# Altium PCB EMG-Arm-ELEC-V2.0.PcbDoc (part 3 of 5)
Units mil, origin at the board's own origin, x right, y up, seen from the top; angles counter-clockwise.
Board outline 8303.83 x 7532.25 mil, 2 copper layers (Top Layer, Bottom Layer), stack 3.556 mil thick; 263 components, 174 nets, 696 pads, 313 vias.
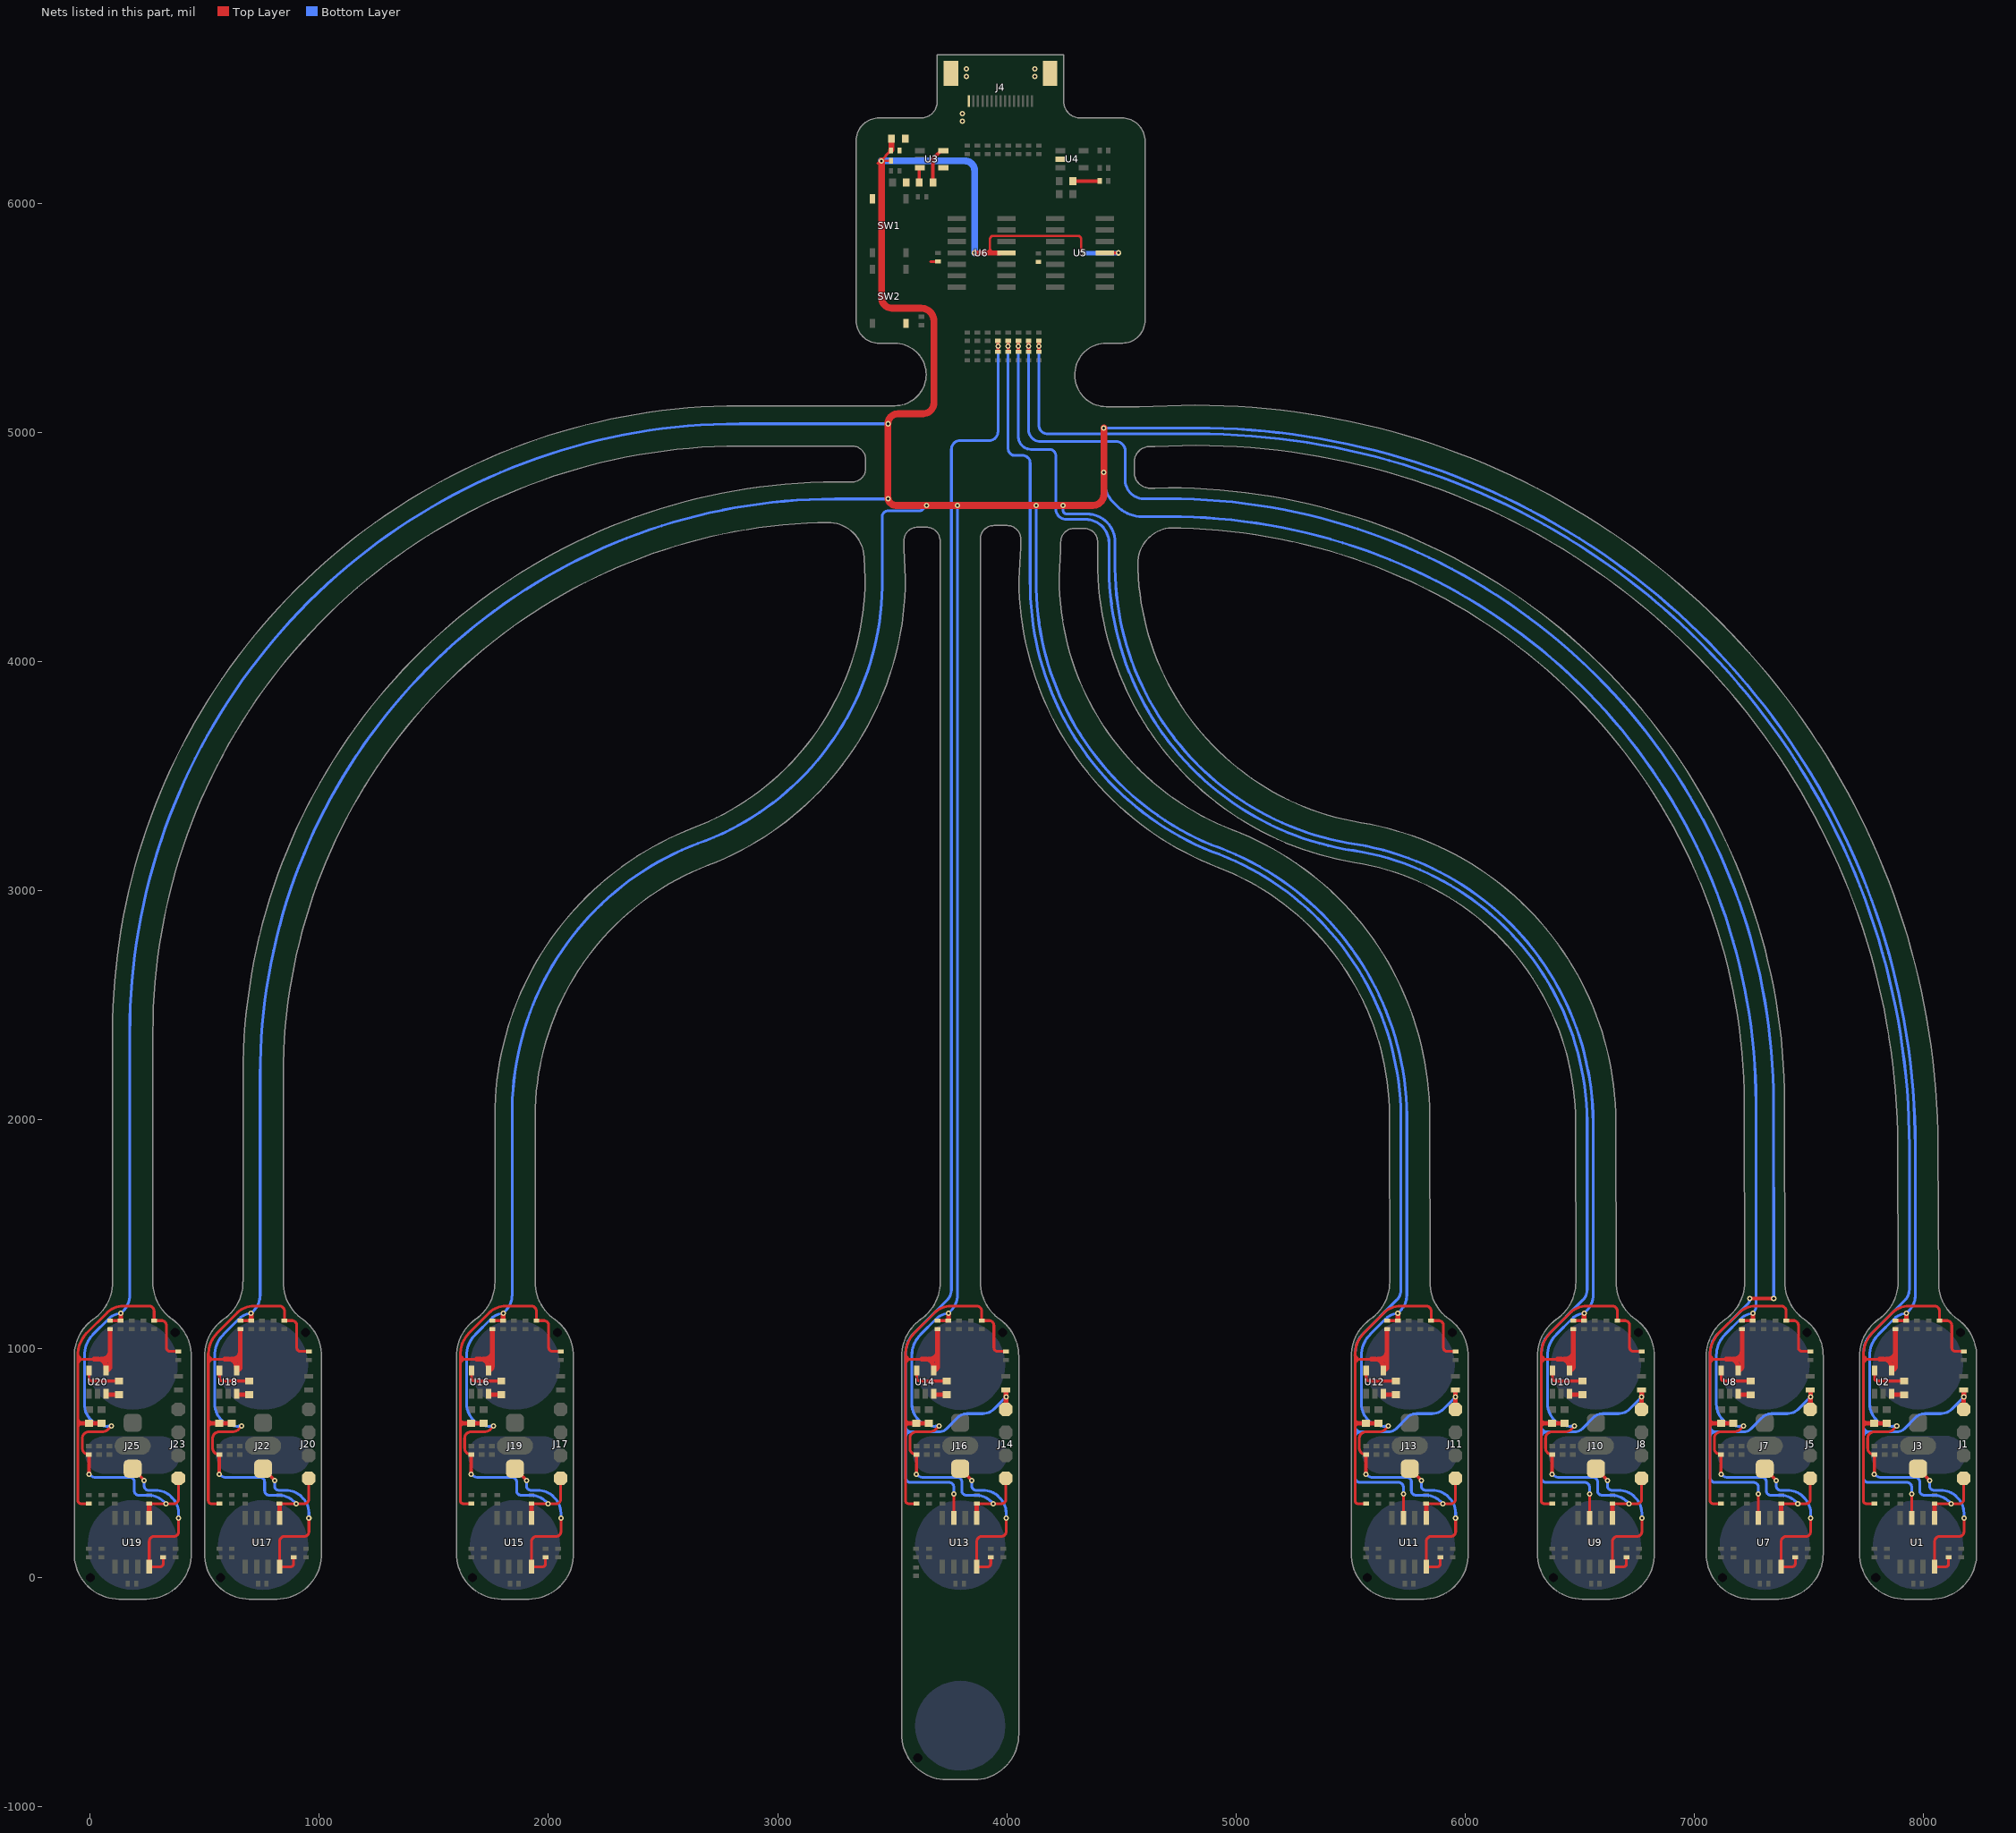
[diagram p2: the nets of this part, all layers, seen from the top]

## Via types
v1: diameter 23.62, hole 11.81, Top Layer to Bottom Layer, tented both sides, 313 vias

## Nets (pads, with @x,y where several pads share a name; then routed paths per layer and width w, separated by ;. In a path a pad name is that pad's centre, name@x,y a point inside that pad or via, vN(x,y) a via of type N, cw(c..) or ccw(c..) an arc to the next point about the centre after c; other vN are vias at no path point) (continued)
-VCC_3V3: C2.1 C7.1 C12.1 C17.1 C22.1 C27.1 C32.1 C37.1 C42.1 J1.4 J5.4 J8.4 J11.4 J14.4 J17.4 J20.4 J23.4 SB11.2 SB29.1 SB104.2 SB110.2 SB112.1 SB204.2 SB210.2 SB212.1 SB304.2 SB310.2 SB312.1 SB404.2 SB410.2 SB412.1 SB504.2 SB510.2 SB512.1 SB604.2 SB610.2 SB612.1 SB704.2 SB710.2 SB712.1 SB804.2 SB810.2 SB812.1 U1.5 U5.11 U6.11 U7.5 U9.5 U11.5 U13.5 U15.5 U17.5 U19.5 | length 58644.1
  Top Layer w10: v1(3453.38,6185.05) 3453.82,6185.49 3494.45,6185.49 SB11.2@3494.89,6185.93 ; 3904.77,5783.05 ccw(c3904.77,5805.41) 3927.13,5805.41 ; 3927.13,5791.41 3927.13,5805.41 ; 3949.49,5783.05 cw(c3949.49,5805.41) 3927.13,5805.41 ; v1(4325.38,5782.28) 4325.38,5843.25 ccw(c4310.81,5843.25) 4310.81,5857.82 3941.48,5857.82 ccw(c3941.48,5843.48) 3927.13,5843.48 3927.13,5805.41
  Top Layer w12: SB810.2@-5.97,536.5 -6.99,536.5 cw(c-6.99,564.5) -34.99,564.5 -34.99,607.98 cw(c-7.32,607.98) -7.32,635.65 49.78,635.65 ccw(c49.78,677.75) 79.56,647.98 91.89,660.31 v1(91.89,660.6) ; C42.1@257.04,322.05 257.2,322.21 329.59,322.21 v1(329.75,322.37) 330.07,322.05 365.7,322.05 ccw(c365.7,340.55) 384.2,340.55 J23.4@384.2,433.06 ; SB710.2@563.01,536.5 561.98,536.5 cw(c561.98,564.5) 533.98,564.5 533.98,607.98 cw(c561.65,607.98) 561.65,635.65 618.76,635.65 ccw(c618.76,677.75) 648.53,647.98 660.87,660.31 v1(660.87,660.6) ; C37.1@826.01,322.05 826.17,322.21 898.57,322.21 v1(898.73,322.37) 899.04,322.05 934.67,322.05 ccw(c934.67,340.55) 953.17,340.55 J20.4@953.17,433.06 ; SB610.2@1662.8,536.5 1661.77,536.5 cw(c1661.77,564.5) 1633.77,564.5 1633.77,607.98 cw(c1661.44,607.98) 1661.44,635.65 1718.54,635.65 ccw(c1718.54,677.75) 1748.32,647.98 1760.65,660.31 v1(1760.65,660.6) ; C32.1@1925.8,322.05 1925.96,322.21 1998.35,322.21 v1(1998.51,322.37) 1998.83,322.05 2034.45,322.05 ccw(c2034.45,340.55) 2052.95,340.55 J17.4@2052.95,433.06 ; 3437.32,6173.92 3449.02,6185.62 3452.81,6185.62 3472.9,6205.7 3472.9,6208.71 SB29.1@3494.45,6230.26 ; v1(3453.38,6185.05) v1@3454.38,6184.05 ; SB11.2@3494.89,6185.93 SB11.2@3495.14,6186.18 ; SB510.2@3606.28,536.5 3605.25,536.5 cw(c3605.25,564.5) 3577.25,564.5 3577.25,607.98 cw(c3604.92,607.98) 3604.92,635.65 3662.03,635.65 ccw(c3662.03,677.75) 3691.8,647.98 3704.13,660.31 v1(3704.13,660.6) ; C27.1@3869.28,322.05 3869.44,322.21 3941.83,322.21 v1(3941.99,322.37) 3942.31,322.05 3977.94,322.05 ccw(c3977.94,340.55) 3996.44,340.55 J14.4@3996.44,433.06 ; U6.11@3970.58,5783.05 U6.11@3999.4,5783.05 ; U5.11@4429.4,5783.05 v1(4488.82,5783.05) ; SB410.2@5568.45,536.5 5567.41,536.5 cw(c5567.41,564.5) 5539.41,564.5 5539.41,607.98 cw(c5567.08,607.98) 5567.08,635.65 5624.19,635.65 ccw(c5624.19,677.75) 5653.97,647.98 5666.3,660.31 v1(5666.3,660.6) ; C22.1@5831.45,322.05 5831.6,322.21 5904,322.21 v1(5904.16,322.37) 5904.47,322.05 5940.1,322.05 ccw(c5940.1,340.55) 5958.6,340.55 J11.4@5958.6,433.06 ; SB310.2@6381.16,536.49 6380.13,536.49 cw(c6380.13,564.49) 6352.13,564.49 6352.13,607.97 cw(c6379.8,607.97) 6379.8,635.64 6436.91,635.64 ccw(c6436.91,677.75) 6466.68,647.97 6479.01,660.31 v1(6479.01,660.6) ; C17.1@6644.16,322.04 6644.32,322.2 6716.71,322.2 v1(6716.87,322.36) 6717.19,322.04 6752.82,322.04 ccw(c6752.82,340.54) 6771.32,340.54 J8.4@6771.32,433.05 ; SB210.2@7117.9,536.5 7116.88,536.5 cw(c7116.88,564.5) 7088.88,564.5 7088.88,607.98 cw(c7116.55,607.98) 7116.55,635.65 7173.65,635.65 ccw(c7173.65,677.75) 7203.43,647.98 7215.76,660.31 v1(7215.76,660.6) ; C12.1@7380.91,322.05 7381.07,322.21 7453.46,322.21 v1(7453.62,322.37) 7453.94,322.05 7489.57,322.05 ccw(c7489.57,340.55) 7508.07,340.55 J5.4@7508.07,433.06 ; SB110.2@7787.38,536.5 7786.35,536.5 cw(c7786.35,564.5) 7758.35,564.5 7758.35,607.98 cw(c7786.02,607.98) 7786.02,635.65 7843.13,635.65 ccw(c7843.13,677.75) 7872.9,647.98 7885.24,660.31 v1(7885.24,660.6) ; C2.1@8050.38,322.05 8050.54,322.21 8122.94,322.21 v1(8123.09,322.37) 8123.41,322.05 8159.04,322.05 ccw(c8159.04,340.55) 8177.54,340.55 J1.4@8177.54,433.06
  Top Layer w15: v1(-5.96,449.88) SB810.2@-5.97,536.5 ; SB812.1@86.15,1121.42 SB804.2@133.24,1121.42 ; v1(563.01,449.88) SB710.2@563.01,536.5 ; SB712.1@655.12,1121.42 SB704.2@702.22,1121.42 ; v1(1662.8,449.88) SB610.2@1662.8,536.5 ; SB612.1@1754.91,1121.42 SB604.2@1802,1121.42 ; v1(3606.28,449.88) SB510.2@3606.28,536.5 ; SB512.1@3698.39,1121.42 SB504.2@3745.49,1121.42 ; v1(5568.45,449.88) SB410.2@5568.45,536.5 ; SB412.1@5660.56,1121.42 SB404.2@5707.65,1121.42 ; v1(6381.16,449.87) SB310.2@6381.16,536.49 ; SB312.1@6473.27,1121.41 SB304.2@6520.37,1121.41 ; v1(7117.91,449.88) SB210.2@7117.9,536.5 ; SB212.1@7210.02,1121.42 SB204.2@7257.11,1121.42 ; v1(7787.38,449.87) SB110.2@7787.38,536.5 ; SB112.1@7879.49,1121.42 SB104.2@7926.59,1121.42
  Top Layer w20: SB804.2@133.24,1124.42 v1(133.24,1153.05) ; U19.5@257.04,259.35 C42.1@257.04,320.05 ; SB704.2@702.22,1124.42 v1(702.22,1153.05) ; U17.5@826.01,259.35 C37.1@826.01,320.05 ; SB604.2@1802,1124.42 v1(1802,1153.05) ; U15.5@1925.8,259.35 C32.1@1925.8,320.05 ; SB504.2@3745.49,1124.42 v1(3745.49,1153.05) ; v1(3860.08,5783.05) 3904.77,5783.05 3949.49,5783.05 U6.11@3970.58,5783.05 ; U13.5@3869.28,259.35 C27.1@3869.28,320.05 ; SB404.2@5707.65,1124.42 v1(5707.65,1153.05) ; U11.5@5831.44,259.35 C22.1@5831.45,320.05 ; SB304.2@6520.37,1124.41 v1(6520.37,1153.04) ; U9.5@6644.16,259.34 C17.1@6644.16,320.04 ; SB204.2@7257.11,1124.42 v1(7257.11,1153.05) ; U7.5@7380.91,259.35 C12.1@7380.91,320.05 ; SB104.2@7926.59,1124.42 v1(7926.59,1153.05) ; U1.5@8050.38,259.35 C2.1@8050.38,320.05
  Top Layer w25: SB29.1@3495.39,6230.98 3497.38,6232.98 C7.1@3497.38,6282.05
  Top Layer w30: v1@3454.38,6184.05 3454.38,5586.54 ccw(c3498.96,5586.54) 3498.96,5541.96 3625.72,5541.96 cw(c3625.72,5485.29) 3682.38,5485.29 3682.38,5128.92 cw(c3634.52,5128.92) 3634.52,5081.05 3525.83,5081.05 ccw(c3525.83,5036.94) v1(3481.72,5036.94) 3481.72,4716.35 ccw(c3517.36,4716.35) 3517.36,4680.7 v1(3651.2,4680.7) v1(3785.04,4680.7) v1(4128.73,4680.7) v1(4245.61,4680.7) 4375.65,4680.7 ccw(c4375.65,4729.44) 4424.38,4729.44 v1(4424.38,4824.72) v1(4424.38,5018.94)
  Bottom Layer w12: v1(-5.96,449.88) ccw(c24.94,480.78) 24.94,437.08 172.85,437.08 cw(c172.85,417.89) 192.04,417.89 192.04,377.92 ccw(c210.9,377.92) 210.9,359.06 251.64,359.06 cw(c251.64,259.06) 275.82,356.09 cw(c251.64,259.06) 322.35,329.77 v1(329.75,322.37) ; 11.56,1060.23 ccw(c101.99,969.76) -25.93,969.76 -25.93,969.69 -25.93,756.99 ccw(c71.04,756.99) 78.12,660.28 91.89,660.46 v1(91.89,660.6) ; 11.56,1060.33 81.15,1129.91 cw(c137.24,1073.82) v1(133.24,1153.05) 143.05,1162.86 ccw(c72.34,1233.57) 172.34,1233.57 172.34,2378.94 cw(c2832.24,2377.04) 2834.14,5036.94 v1(3481.72,5036.94) ; v1(563.01,449.88) ccw(c593.91,480.78) 593.91,437.08 741.82,437.08 cw(c741.82,417.89) 761.01,417.89 761.01,377.92 ccw(c779.87,377.92) 779.87,359.06 820.61,359.06 cw(c820.61,259.06) 844.8,356.09 cw(c820.61,259.06) 891.32,329.77 v1(898.73,322.37) ; 580.54,1060.23 ccw(c670.97,969.76) 543.05,969.76 543.05,969.69 543.05,756.99 ccw(c640.02,756.99) 647.1,660.28 660.87,660.46 v1(660.87,660.6) ; 580.54,1060.33 650.12,1129.91 cw(c706.22,1073.82) v1(702.22,1153.05) 712.03,1162.86 ccw(c641.32,1233.57) 741.32,1233.57 741.32,2193.94 cw(c3252.73,2197.53) 3249.14,4708.94 3482.1,4708.94 v1(3482.43,4709.26) ; v1(1662.8,449.88) ccw(c1693.7,480.78) 1693.7,437.08 1841.61,437.08 cw(c1841.61,417.89) 1860.8,417.89 1860.8,377.92 ccw(c1879.66,377.92) 1879.66,359.06 1920.39,359.06 cw(c1920.39,259.06) 1944.58,356.09 cw(c1920.39,259.06) 1991.11,329.77 v1(1998.51,322.37) ; 1680.32,1060.23 ccw(c1770.75,969.76) 1642.83,969.76 1642.83,969.69 1642.83,756.99 ccw(c1739.8,756.99) 1746.88,660.28 1760.65,660.46 v1(1760.65,660.6) ; 1680.32,1060.33 1749.91,1129.91 cw(c1806,1073.82) v1(1802,1153.05) 1811.9,1162.95 ccw(c1741.19,1233.66) 1841.19,1233.66 ; 1841.32,1233.78 1841.32,2014.96 cw(c3096.2,2031.03) 2688.55,3217.96 ccw(c2245.92,4344.71) 3456.37,4361.53 3456.37,4630.88 cw(c3482.43,4630.88) 3482.43,4656.94 3618.23,4656.94 ccw(c3618.23,4679.16) 3633.92,4663.43 ; v1(3606.28,449.88) ccw(c3637.18,480.78) 3637.18,437.08 3785.09,437.08 cw(c3785.09,417.89) 3804.28,417.89 3804.28,377.92 ccw(c3823.14,377.92) 3823.14,359.06 3863.88,359.06 cw(c3863.88,259.06) 3888.06,356.09 cw(c3863.88,259.06) 3934.59,329.77 v1(3941.99,322.37) ; 3623.81,1060.23 ccw(c3714.24,969.76) 3586.32,969.76 3586.32,969.69 3586.32,756.99 ccw(c3683.29,756.99) 3690.36,660.28 3704.14,660.46 v1(3704.13,660.6) ; 3623.81,1060.33 3693.39,1129.92 cw(c3749.49,1073.82) v1(3745.49,1153.05) 3755.75,1163.31 ccw(c3685.04,1234.02) 3785.04,1234.02 v1(3785.04,4680.7) ; 3633.94,4663.44 v1(3651.2,4680.7) ; v1(4128.73,4680.7) 4128.73,4354.88 ccw(c5369.33,4344.18) 4891.89,3199.08 cw(c4482.97,2003.1) 5746.84,2017.92 5746.84,1233.66 cw(c5646.84,1233.66) 5717.55,1162.95 v1(5707.65,1153.05) ccw(c5711.65,1073.82) 5655.55,1129.91 5585.97,1060.33 ; v1(4245.61,4680.7) 4245.61,4660.64 ccw(c4263.2,4660.64) 4263.2,4643.05 4351.26,4643.05 cw(c4351.26,4521.34) 4472.97,4521.34 4472.97,4443.55 ccw(c5704.31,4419.63) 5492.43,3206.42 cw(c5322.15,1980.41) 6559.91,1984.52 6559.91,1234.01 cw(c6459.91,1234.01) 6559.48,1224.71 cw(c6459.91,1234.01) 6530.62,1163.3 v1(6520.37,1153.04) ccw(c6524.37,1073.81) 6468.27,1129.91 6398.69,1060.33 ; v1(4325.38,5782.28) v1@4325.77,5782.66 ; v1(4424.38,4824.72) 4424.38,4795.21 ccw(c4569.91,4795.34) 4467.01,4692.43 4467.07,4692.36 4482.04,4677.4 4482.09,4677.35 ccw(c4591.72,4786.99) 4591.73,4631.94 4591.79,4631.94 4706.14,4631.94 cw(c4708.94,2070.13) 7270.75,2072.94 7270.75,1185.97 cw(c7224.19,1185.97) v1(7257.11,1153.05) ccw(c7261.11,1073.82) 7205.02,1129.92 7135.43,1060.33 ; v1@4434.38,5018.94 4825.14,5018.94 cw(c4827.49,1880.58) 7965.84,1882.94 7965.84,1229.72 cw(c7875.5,1229.72) 7939.38,1165.84 v1(7926.59,1153.05) ccw(c7930.59,1073.81) 7874.49,1129.91 7804.91,1060.33 ; v1@4488.43,5782.66 v1(4488.82,5783.05) ; v1(5568.45,449.88) ccw(c5599.35,480.78) 5599.35,437.08 5747.26,437.08 cw(c5747.26,417.89) 5766.44,417.89 5766.45,377.92 ccw(c5785.31,377.92) 5785.31,359.06 5826.04,359.06 cw(c5826.04,259.06) 5850.23,356.09 cw(c5826.04,259.06) 5896.75,329.77 v1(5904.16,322.37) ; 5585.97,1060.23 ccw(c5676.4,969.76) 5548.48,969.76 5548.48,969.69 5548.48,756.99 ccw(c5645.45,756.99) 5652.53,660.28 5666.3,660.46 v1(5666.3,660.6) ; v1(6381.16,449.87) ccw(c6412.06,480.77) 6412.06,437.07 6559.97,437.07 cw(c6559.97,417.88) 6579.16,417.88 6579.16,377.91 ccw(c6598.02,377.91) 6598.02,359.05 6638.76,359.05 cw(c6638.76,259.05) 6662.94,356.09 cw(c6638.76,259.05) 6709.47,329.76 v1(6716.87,322.36) ; 6398.69,1060.23 ccw(c6489.11,969.75) 6361.2,969.75 6361.2,969.68 6361.2,756.99 ccw(c6458.17,756.99) 6465.24,660.27 6479.01,660.45 v1(6479.01,660.6) ; v1(7117.91,449.88) ccw(c7148.81,480.78) 7148.81,437.08 7296.72,437.08 cw(c7296.72,417.89) 7315.91,417.89 7315.91,377.92 ccw(c7334.77,377.92) 7334.77,359.06 7375.51,359.06 cw(c7375.51,259.06) 7399.69,356.09 cw(c7375.51,259.06) 7446.22,329.77 v1(7453.62,322.37) ; 7135.43,1060.23 ccw(c7225.86,969.76) 7097.94,969.76 7097.94,969.69 7097.94,756.99 ccw(c7194.91,756.99) 7201.99,660.28 7215.76,660.46 v1(7215.76,660.6) ; v1(7787.38,449.87) ccw(c7818.28,480.78) 7818.28,437.08 7966.19,437.08 cw(c7966.19,417.89) 7985.38,417.89 7985.38,377.92 ccw(c8004.24,377.92) 8004.24,359.06 8044.98,359.06 cw(c8044.98,259.06) 8069.16,356.09 cw(c8044.98,259.06) 8115.69,329.77 v1(8123.09,322.37) ; 7804.91,1060.23 ccw(c7895.34,969.76) 7767.42,969.76 7767.42,969.69 7767.42,756.99 ccw(c7864.39,756.99) 7871.46,660.28 7885.24,660.46 v1(7885.24,660.6)
  Bottom Layer w20: v1@4325.77,5782.66 v1@4488.43,5782.66
  Bottom Layer w30: v1(3453.38,6185.05) 3816.49,6185.05 cw(c3816.49,6141.45) 3860.08,6141.45 v1(3860.08,5783.05)
CAP1+: C5.1 U2.5 | length 171
  Top Layer w12: U2.5@7787.98,904.23 7787.98,869.95 ccw(c7800.22,869.95) 7800.22,857.72 C5.1@7917.69,857.72
CAP1-: C5.2 U2.3 | length 53.1
  Top Layer w20: U2.3@7864.59,797.72 C5.2@7917.69,797.72
CAP2+: C15.1 U8.5 | length 171
  Top Layer w12: U8.5@7118.51,904.23 7118.51,869.95 ccw(c7130.74,869.95) 7130.74,857.72 C15.1@7248.21,857.72
CAP2-: C15.2 U8.3 | length 53.1
  Top Layer w20: U8.3@7195.12,797.72 C15.2@7248.21,797.72
CAP3+: C20.1 U10.5 | length 171
  Top Layer w12: U10.5@6381.76,904.23 6381.76,869.95 ccw(c6393.99,869.95) 6393.99,857.71 C20.1@6511.46,857.71
CAP3-: C20.2 U10.3 | length 53.1
  Top Layer w20: U10.3@6458.37,797.71 C20.2@6511.46,797.71
CAP4+: C25.1 U12.5 | length 171
  Top Layer w12: U12.5@5569.04,904.23 5569.04,869.95 ccw(c5581.28,869.95) 5581.28,857.72 C25.1@5698.75,857.72
CAP4-: C25.2 U12.3 | length 53.1
  Top Layer w20: U12.3@5645.66,797.72 C25.2@5698.75,797.72
CAP5+: C30.1 U14.5 | length 171
  Top Layer w12: U14.5@3606.88,904.23 3606.88,869.95 ccw(c3619.11,869.95) 3619.11,857.72 C30.1@3736.59,857.72
CAP5-: C30.2 U14.3 | length 53.1
  Top Layer w20: U14.3@3683.49,797.72 C30.2@3736.59,797.72
CAP6+: C35.1 U16.5 | length 171
  Top Layer w12: U16.5@1663.39,904.23 1663.39,869.95 ccw(c1675.63,869.95) 1675.63,857.72 C35.1@1793.1,857.72
CAP6-: C35.2 U16.3 | length 53.1
  Top Layer w20: U16.3@1740.01,797.72 C35.2@1793.1,797.72
CAP7+: C40.1 U18.5 | length 171
  Top Layer w12: U18.5@563.61,904.23 563.61,869.95 ccw(c575.85,869.95) 575.85,857.72 C40.1@693.32,857.72
CAP7-: C40.2 U18.3 | length 53.1
  Top Layer w20: U18.3@640.23,797.72 C40.2@693.32,797.72
CAP8+: C45.1 U20.5 | length 171
  Top Layer w12: U20.5@-5.36,904.23 -5.36,869.95 ccw(c6.87,869.95) 6.87,857.72 C45.1@124.34,857.72
CAP8-: C45.2 U20.3 | length 53.1
  Top Layer w20: U20.3@71.25,797.72 C45.2@124.34,797.72
CAP+: C10.1 U3.5 | length 162.3
  Top Layer w15: C10.1@3678.26,6090.49 3678.26,6180.51 cw(c3711.63,6180.51) 3688.01,6204.09 ; 3688.03,6204.11 3713.62,6229.7 U3.5@3723.46,6229.7
CAP-: C10.2 U3.3 | length 65.6
  Top Layer w15: C10.2@3618.26,6090.49 3618.26,6152.06 U3.3@3621.1,6154.9
END1: J3.1 SB106.1 U1.4 | length 754.7
  Top Layer w12: J3.1@7978.35,474.23 J3.1@7978.35,475 ; v1(8028.71,423.11) v1@8028.71,423.87 ; SB106.1@8111.58,88.17 8111.58,59.25 cw(c8099.08,59.25) 8099.08,46.75 U1.4@8050.38,46.75 8050.38,156.56 cw(c8073.38,156.56) 8073.38,179.56 8159.18,179.56 ccw(c8159.18,198.94) 8178.56,198.94 v1(8178.56,259.35)
  Top Layer w15: J3.1@7978.35,474.23 v1@8028.71,423.87
  Bottom Layer w12: v1(8028.71,423.11) 8028.71,399.15 ccw(c8047.28,399.15) 8047.28,380.58 8078.48,380.58 cw(c8078.48,284.44) 8139.1,359.06 8151.98,346.18 cw(c8087.81,282) 8178.56,282 v1(8178.56,259.35)
END2: J7.1 SB206.1 U7.4 | length 754.7
  Top Layer w12: J7.1@7308.87,474.23 J7.1@7308.87,475 ; v1(7359.23,423.11) v1@7359.23,423.87 ; SB206.1@7442.11,88.17 7442.11,59.25 cw(c7429.61,59.25) 7429.61,46.75 U7.4@7380.91,46.75 7380.91,156.56 cw(c7403.91,156.56) 7403.91,179.56 7489.7,179.56 ccw(c7489.7,198.94) 7509.09,198.94 v1(7509.09,259.35)
  Top Layer w15: J7.1@7308.87,474.23 v1@7359.23,423.87
  Bottom Layer w12: v1(7359.23,423.11) 7359.23,399.15 ccw(c7377.8,399.15) 7377.8,380.58 7409.01,380.58 cw(c7409.01,284.44) 7469.62,359.06 7482.5,346.18 cw(c7418.33,282.01) 7509.09,282.01 v1(7509.09,259.35)
END3: J10.1 SB306.1 U9.4 | length 754.7
  Top Layer w12: J10.1@6572.12,474.23 J10.1@6572.12,475 ; v1(6622.48,423.1) v1@6622.48,423.87 ; SB306.1@6705.36,88.16 6705.36,59.25 cw(c6692.86,59.25) 6692.86,46.75 U9.4@6644.16,46.75 6644.16,156.55 cw(c6667.16,156.55) 6667.16,179.55 6752.95,179.55 ccw(c6752.95,198.94) 6772.34,198.94 v1(6772.34,259.34)
  Top Layer w15: J10.1@6572.12,474.23 v1@6622.48,423.87
  Bottom Layer w12: v1(6622.48,423.1) 6622.48,399.14 ccw(c6641.05,399.14) 6641.05,380.57 6672.26,380.57 cw(c6672.26,284.43) 6732.87,359.05 6745.76,346.17 cw(c6681.58,282) 6772.34,282 v1(6772.34,259.34)
END4: J13.1 SB406.1 U11.4 | length 754.7
  Top Layer w12: J13.1@5759.41,474.23 J13.1@5759.41,475 ; v1(5809.77,423.11) v1@5809.77,423.87 ; SB406.1@5892.64,88.17 5892.64,59.25 cw(c5880.14,59.25) 5880.14,46.75 U11.4@5831.44,46.75 5831.45,156.56 cw(c5854.45,156.56) 5854.45,179.56 5940.24,179.56 ccw(c5940.24,198.94) 5959.62,198.94 v1(5959.62,259.35)
  Top Layer w15: J13.1@5759.41,474.23 v1@5809.77,423.87
  Bottom Layer w12: v1(5809.77,423.11) 5809.77,399.15 ccw(c5828.34,399.15) 5828.34,380.58 5859.55,380.58 cw(c5859.55,284.44) 5920.16,359.06 5933.04,346.18 cw(c5868.87,282) 5959.62,282 v1(5959.62,259.35)
END5: J16.1 SB506.1 U13.4 | length 754.7
  Top Layer w12: J16.1@3797.25,474.23 J16.1@3797.25,475 ; v1(3847.61,423.11) v1@3847.61,423.87 ; SB506.1@3930.48,88.17 3930.48,59.25 cw(c3917.98,59.25) 3917.98,46.75 U13.4@3869.28,46.75 3869.28,156.56 cw(c3892.28,156.56) 3892.28,179.56 3978.08,179.56 ccw(c3978.08,198.94) 3997.46,198.94 v1(3997.46,259.35)
  Top Layer w15: J16.1@3797.25,474.23 v1@3847.61,423.87
  Bottom Layer w12: v1(3847.61,423.11) 3847.61,399.15 ccw(c3866.18,399.15) 3866.18,380.58 3897.38,380.58 cw(c3897.38,284.44) 3958,359.06 3970.88,346.18 cw(c3906.7,282.01) 3997.46,282.01 v1(3997.46,259.35)
END6: J19.1 SB606.1 U15.4 | length 754.7
  Top Layer w12: J19.1@1853.76,474.23 J19.1@1853.76,475 ; v1(1904.12,423.11) v1@1904.12,423.87 ; SB606.1@1987,88.17 1987,59.25 cw(c1974.5,59.25) 1974.5,46.75 U15.4@1925.8,46.75 1925.8,156.56 cw(c1948.8,156.56) 1948.8,179.56 2034.59,179.56 ccw(c2034.59,198.94) 2053.98,198.94 v1(2053.98,259.35)
  Top Layer w15: J19.1@1853.76,474.23 v1@1904.12,423.87
  Bottom Layer w12: v1(1904.12,423.11) 1904.12,399.15 ccw(c1922.69,399.15) 1922.69,380.58 1953.9,380.58 cw(c1953.9,284.44) 2014.51,359.06 2027.39,346.18 cw(c1963.22,282) 2053.98,282 v1(2053.98,259.35)
END7: J22.1 SB706.1 U17.4 | length 754.7
  Top Layer w12: J22.1@753.98,474.23 J22.1@753.98,475 ; v1(804.34,423.11) v1@804.34,423.87 ; SB706.1@887.21,88.17 887.21,59.25 cw(c874.71,59.25) 874.71,46.75 U17.4@826.01,46.75 826.01,156.56 cw(c849.01,156.56) 849.01,179.56 934.81,179.56 ccw(c934.81,198.94) 954.19,198.94 v1(954.19,259.35)
  Top Layer w15: J22.1@753.98,474.23 v1@804.34,423.87
  Bottom Layer w12: v1(804.34,423.11) 804.34,399.15 ccw(c822.91,399.15) 822.91,380.58 854.12,380.58 cw(c854.12,284.44) 914.73,359.06 927.61,346.18 cw(c863.44,282.01) 954.19,282.01 v1(954.19,259.35)
END8: J25.1 SB806.1 U19.4 | length 754.7
  Top Layer w12: J25.1@185,474.23 J25.1@185,475 ; v1(235.36,423.11) v1@235.36,423.87 ; SB806.1@318.24,88.17 318.24,59.25 cw(c305.74,59.25) 305.74,46.75 U19.4@257.04,46.75 257.04,156.56 cw(c280.04,156.56) 280.04,179.56 365.83,179.56 ccw(c365.83,198.94) 385.22,198.94 v1(385.22,259.35)
  Top Layer w15: J25.1@185,474.23 v1@235.36,423.87
  Bottom Layer w12: v1(235.36,423.11) 235.36,399.15 ccw(c253.93,399.15) 253.93,380.58 285.14,380.58 cw(c285.14,284.44) 345.75,359.06 358.63,346.18 cw(c294.46,282) 385.22,282 v1(385.22,259.35)
GND: C6.2 C7.2 C8.2 C9.2 J4.1 J4.MP1 J4.MP2 R6.2 SB28.2 SB29.2 SW1.2 SW2.2 U3.4 U4.2 | length 150.6
  Top Layer w12: 3667.48,5744.82 3699.08,5744.82 C9.2@3699.55,5745.29
  Top Layer w15: R6.2@4289.05,6096.29 4405.38,6096.29 SB28.2@4405.38,6094.3
  other v1: 3806.38,6358.18 3806.38,6390.66 3824.38,6554.05 4122.11,6554.05 3824.38,6586.53 4122.11,6586.53
GND_ELEC1: C3.1 C4.1 R2.1 R4.2 SB111.2 SB112.2 U2.4 | length 2181.1
  Top Layer w12: 7739.28,970.3 ccw(c7758.82,977.06) 7739.35,970.09 ; 7739.35,655.17 cw(c7754.6,654.75) 7747.05,668 ; 7739.35,660.17 ccw(c7751.35,659.87) 7739.35,660.12 ; 7739.35,691.82 ccw(c7754.6,692.25) 7754.6,677 ; 7739.35,938.6 7739.35,966.84 ; 7739.35,950.5 7739.35,660.12 ; 7739.35,966.9 ccw(c7754.6,967.09) 7739.35,966.84 ; 7739.35,976.27 7739.35,966.84 ; 7739.49,936.21 cw(c7759.03,929.45) 7749.41,947.75 ; 7747.05,673 cw(c7754.6,659.75) 7754.6,675 ; 7749.2,958.76 cw(c7758.82,977.06) 7739.35,970.09 ; 7750.41,949.75 7760.03,952.13 7806.31,951.84 7837.74,951.84 7856.79,951.84 ; 7754.6,951.84 cw(c7754.6,967.09) 7739.35,966.84 ; C4.1@7785.43,675 cw(c7785.43,673.05) C4.1@7787.38,673.05 ; R4.2@7787.38,322.06 7752.82,322.06 cw(c7752.82,335.53) 7739.35,335.53 7739.35,659.94 cw(c7751.35,659.87) 7739.35,660.12 ; 7855.77,952.09 7856.79,951.84 ; 7859.97,951.84 7856.79,951.84 ; 7860.97,951.84 cw(c7860.97,934.03) 7876.45,942.85 ; 7875.31,938.18 ccw(c7855.77,931.42) 7865.39,949.72 7856.79,951.84 ; 7876.45,938.57 7876.45,942.85 ; 7876.45,966.87 cw(c7861.2,967.06) 7876.45,966.81 7876.45,942.85 ; SB112.2@7877.53,1079.47 SB112.2@7877.53,1084.42 ; 7878.78,934.03 ccw(c7860.97,934.03) 7876.45,942.85 ; R2.1@8178.02,987.08 8141.36,987.08 cw(c8141.36,1003.05) 8125.38,1003.05 8125.38,1100.32 ccw(c8104.28,1100.32) 8104.28,1121.42 SB111.2@8071.88,1121.42 8071.88,1162.92 ccw(c8049.75,1162.92) 8049.75,1185.05 7936.94,1185.05 ccw(c7936.94,1085.05) 7866.23,1155.76 7777.84,1067.37 ccw(c7902.27,955.7) 7745.51,1013.84 ccw(c7756.78,1009.72) 7745.11,1012.5 7745.1,1012.44 7741.74,997.98 ccw(c7753.43,995.28) 7741.5,996.6 7739.42,977.52 ccw(c7751.35,976.22) 7739.35,976.22 7739.35,970.09 ; 7739.35,966.84 7739.35,970.09
  Top Layer w20: 7743.6,673 7747.05,673 C4.1@7792.23,673 ; C4.1@7787.38,673.05 C3.1@7841.84,673.04 ; 7810.17,953.24 7828.33,953.24 cw(c7828.33,920.93) 7837.74,951.84 cw(c7828.33,920.93) 7860.64,920.93 U2.4@7860.64,913.6 ; 7839.8,954.29 7847.14,954.29 ccw(c7847.14,986.6) 7879.45,986.6 7879.45,1004.76 ; U2.4@7862.78,904.23 ccw(c7862.78,920.94) 7879.49,920.94 SB112.2@7879.49,1082.51
GND_ELEC2: C13.1 C14.1 R10.1 R12.2 SB211.2 SB212.2 U8.4 | length 2181.1
  Top Layer w12: 7069.8,970.3 ccw(c7089.35,977.06) 7069.88,970.09 ; 7069.88,655.17 cw(c7085.12,654.75) 7077.57,668 ; 7069.88,660.17 ccw(c7081.88,659.87) 7069.88,660.12 ; 7069.88,691.82 ccw(c7085.12,692.25) 7085.12,677 ; 7069.88,938.6 7069.88,966.84 ; 7069.88,950.5 7069.88,660.12 ; 7069.88,966.91 ccw(c7085.12,967.09) 7069.88,966.84 ; 7069.88,976.27 7069.88,966.84 ; 7070.01,936.21 cw(c7089.55,929.45) 7079.93,947.75 ; 7077.57,673 cw(c7085.12,659.75) 7085.12,675 ; 7079.72,958.76 cw(c7089.35,977.06) 7069.88,970.09 ; 7080.93,949.75 7090.55,952.13 7136.84,951.85 7168.26,951.85 7187.31,951.85 ; 7085.12,951.85 cw(c7085.12,967.09) 7069.88,966.84 ; C14.1@7115.96,675 cw(c7115.96,673.05) C14.1@7117.91,673.05 ; R12.2@7117.91,322.06 7083.35,322.06 cw(c7083.35,335.53) 7069.87,335.53 7069.88,659.94 cw(c7081.88,659.87) 7069.88,660.12 ; 7186.3,952.1 7187.31,951.85 ; 7190.5,951.85 7187.31,951.85 ; 7191.5,951.85 cw(c7191.5,934.03) 7206.97,942.85 ; 7205.84,938.18 ccw(c7186.3,931.42) 7195.92,949.72 7187.31,951.85 ; 7206.97,938.57 7206.97,942.85 ; 7206.97,966.87 cw(c7191.73,967.06) 7206.97,966.81 7206.97,942.85 ; SB212.2@7208.06,1079.47 SB212.2@7208.06,1084.42 ; 7209.31,934.03 ccw(c7191.5,934.03) 7206.97,942.85 ; R10.1@7508.55,987.08 7471.88,987.08 cw(c7471.88,1003.05) 7455.91,1003.05 7455.91,1100.32 ccw(c7434.81,1100.32) 7434.81,1121.42 SB211.2@7402.41,1121.42 7402.41,1162.92 ccw(c7380.27,1162.92) 7380.27,1185.05 7267.46,1185.05 ccw(c7267.46,1085.05) 7196.75,1155.76 7108.37,1067.37 ccw(c7232.79,955.7) 7076.04,1013.84 ccw(c7087.31,1009.72) 7075.63,1012.5 7075.62,1012.44 7072.26,997.98 ccw(c7083.95,995.28) 7072.03,996.6 7069.95,977.52 ccw(c7081.88,976.22) 7069.88,976.22 7069.88,970.09 ; 7069.88,966.84 7069.88,970.09
  Top Layer w20: 7074.12,673 7077.57,673 C14.1@7122.76,673 ; C14.1@7117.91,673.05 C13.1@7172.36,673.04 ; 7140.7,953.25 7158.85,953.25 cw(c7158.85,920.93) 7168.26,951.85 cw(c7158.85,920.93) 7191.17,920.93 U8.4@7191.17,913.6 ; 7170.33,954.29 7177.66,954.29 ccw(c7177.66,986.61) 7209.97,986.61 7209.97,1004.76 ; U8.4@7193.31,904.23 ccw(c7193.31,920.94) 7210.02,920.94 SB212.2@7210.02,1082.51
GND_ELEC3: C18.1 C19.1 R14.1 R16.2 SB311.2 SB312.2 U10.4 | length 2181.1
  Top Layer w12: 6333.05,970.3 ccw(c6352.6,977.06) 6333.13,970.09 ; 6333.13,655.17 cw(c6348.37,654.74) 6340.82,667.99 ; 6333.13,660.17 ccw(c6345.13,659.87) 6333.13,660.11 ; 6333.13,691.82 ccw(c6348.37,692.24) 6348.37,676.99 ; 6333.13,938.59 6333.13,966.84 ; 6333.13,950.49 6333.13,660.11 ; 6333.13,966.9 ccw(c6348.37,967.09) 6333.13,966.84 ; 6333.13,976.26 6333.13,966.84 ; 6333.26,936.2 cw(c6352.81,929.44) 6343.18,947.75 ; 6340.82,672.99 cw(c6348.37,659.74) 6348.37,674.99 ; 6342.98,958.75 cw(c6352.6,977.06) 6333.13,970.09 ; 6344.18,949.75 6353.81,952.12 6400.09,951.84 6431.51,951.84 6450.56,951.84 ; 6348.37,951.84 cw(c6348.37,967.09) 6333.13,966.84 ; C19.1@6379.21,674.99 cw(c6379.21,673.04) C19.1@6381.16,673.04 ; R16.2@6381.16,322.05 6346.6,322.05 cw(c6346.6,335.53) 6333.12,335.53 6333.13,659.93 cw(c6345.13,659.87) 6333.13,660.11 ; 6449.55,952.09 6450.56,951.84 ; 6453.75,951.84 6450.56,951.84 ; 6454.75,951.84 cw(c6454.75,934.03) 6470.22,942.84 ; 6469.09,938.17 ccw(c6449.55,931.41) 6459.17,949.71 6450.56,951.84 ; 6470.22,938.56 6470.22,942.84 ; 6470.23,966.87 cw(c6454.98,967.05) 6470.22,966.81 6470.22,942.84 ; SB312.2@6471.31,1079.47 SB312.2@6471.31,1084.41 ; 6472.56,934.03 ccw(c6454.75,934.03) 6470.22,942.84 ; R14.1@6771.8,987.07 6735.13,987.07 cw(c6735.13,1003.04) 6719.16,1003.04 6719.16,1100.32 ccw(c6698.06,1100.32) 6698.06,1121.41 SB311.2@6665.66,1121.41 6665.66,1162.91 ccw(c6643.52,1162.91) 6643.52,1185.04 6530.72,1185.04 ccw(c6530.72,1085.04) 6460.01,1155.76 6371.62,1067.37 ccw(c6496.04,955.7) 6339.29,1013.84 ccw(c6350.56,1009.72) 6338.88,1012.49 6338.87,1012.43 6335.51,997.97 ccw(c6347.21,995.28) 6335.28,996.6 6333.2,977.51 ccw(c6345.13,976.21) 6333.13,976.21 6333.13,970.09 ; 6333.13,966.84 6333.13,970.09
  Top Layer w20: 6337.37,672.99 6340.82,672.99 C19.1@6386.01,672.99 ; C19.1@6381.16,673.04 C18.1@6435.61,673.04 ; 6403.95,953.24 6422.1,953.24 cw(c6422.1,920.93) 6431.51,951.84 cw(c6422.1,920.93) 6454.42,920.93 U10.4@6454.42,913.59 ; 6433.58,954.29 6440.91,954.29 ccw(c6440.91,986.6) 6473.23,986.6 6473.23,1004.75 ; U10.4@6456.56,904.23 ccw(c6456.56,920.93) 6473.27,920.93 SB312.2@6473.27,1082.51
GND_ELEC4: C23.1 C24.1 R18.1 R20.2 SB411.2 SB412.2 U12.4 | length 2181.1
  Top Layer w12: 5520.34,970.3 ccw(c5539.88,977.06) 5520.42,970.09 ; 5520.42,655.17 cw(c5535.66,654.75) 5528.11,668 ; 5520.42,660.17 ccw(c5532.41,659.87) 5520.42,660.12 ; 5520.42,691.82 ccw(c5535.66,692.25) 5535.66,677 ; 5520.42,938.6 5520.42,966.84 ; 5520.42,950.5 5520.41,660.12 ; 5520.41,966.91 ccw(c5535.66,967.09) 5520.42,966.84 ; 5520.42,976.27 5520.42,966.84 ; 5520.55,936.21 cw(c5540.09,929.45) 5530.47,947.75 ; 5528.11,673 cw(c5535.66,659.75) 5535.66,675 ; 5530.26,958.76 cw(c5539.88,977.06) 5520.42,970.09 ; 5531.47,949.75 5541.09,952.13 5587.38,951.84 5618.8,951.84 5637.85,951.84 ; 5535.66,951.85 cw(c5535.66,967.09) 5520.42,966.84 ; C24.1@5566.5,675 cw(c5566.5,673.05) C24.1@5568.45,673.05 ; R20.2@5568.45,322.06 5533.88,322.06 cw(c5533.88,335.53) 5520.41,335.53 5520.41,659.94 cw(c5532.41,659.87) 5520.42,660.12 ; 5636.83,952.1 5637.85,951.84 ; 5641.03,951.84 5637.85,951.84 ; 5642.03,951.84 cw(c5642.03,934.03) 5657.51,942.85 ; 5656.38,938.18 ccw(c5636.83,931.42) 5646.46,949.72 5637.85,951.84 ; 5657.51,938.57 5657.51,942.85 ; 5657.51,966.87 cw(c5642.27,967.06) 5657.51,966.81 5657.51,942.85 ; SB412.2@5658.59,1079.47 SB412.2@5658.59,1084.42 ; 5659.85,934.03 ccw(c5642.03,934.03) 5657.51,942.85 ; R18.1@5959.09,987.08 5922.42,987.08 cw(c5922.42,1003.05) 5906.45,1003.05 5906.45,1100.32 ccw(c5885.35,1100.32) 5885.35,1121.42 SB411.2@5852.94,1121.42 5852.94,1162.92 ccw(c5830.81,1162.92) 5830.81,1185.05 5718,1185.05 ccw(c5718,1085.05) 5647.29,1155.76 5558.9,1067.37 ccw(c5683.33,955.7) 5526.58,1013.84 ccw(c5537.85,1009.72) 5526.17,1012.5 5526.16,1012.44 5522.8,997.98 ccw(c5534.49,995.28) 5522.57,996.6 5520.49,977.52 ccw(c5532.42,976.22) 5520.42,976.22 5520.42,970.09 ; 5520.42,966.84 5520.42,970.09
  Top Layer w20: 5524.66,673 5528.11,673 C24.1@5573.29,673 ; C24.1@5568.45,673.05 C23.1@5622.9,673.04 ; 5591.24,953.25 5609.39,953.25 cw(c5609.39,920.93) 5618.8,951.84 cw(c5609.39,920.93) 5641.71,920.93 U12.4@5641.7,913.6 ; 5620.86,954.29 5628.2,954.29 ccw(c5628.2,986.61) 5660.51,986.61 5660.51,1004.76 ; U12.4@5643.85,904.23 ccw(c5643.85,920.94) 5660.56,920.94 SB412.2@5660.56,1082.51
GND_ELEC5: C28.1 C29.1 R22.1 R24.2 SB511.2 SB512.2 U14.4 | length 2181.1
  Top Layer w12: 3558.18,970.3 ccw(c3577.72,977.06) 3558.25,970.09 ; 3558.25,655.17 cw(c3573.5,654.75) 3565.95,668 ; 3558.25,660.17 ccw(c3570.25,659.87) 3558.25,660.12 ; 3558.25,691.82 ccw(c3573.5,692.25) 3573.5,677 ; 3558.25,938.6 3558.25,966.85 ; 3558.25,950.5 3558.25,660.12 ; 3558.25,966.91 ccw(c3573.5,967.09) 3558.25,966.85 ; 3558.25,976.27 3558.25,966.85 ; 3558.39,936.21 cw(c3577.93,929.45) 3568.31,947.75 ; 3565.95,673 cw(c3573.5,659.75) 3573.5,675 ; 3568.1,958.76 cw(c3577.72,977.06) 3558.25,970.09 ; 3569.31,949.75 3578.93,952.13 3625.21,951.85 3656.64,951.85 3675.69,951.85 ; 3573.5,951.85 cw(c3573.5,967.09) 3558.25,966.85 ; C29.1@3604.33,675 cw(c3604.33,673.05) C29.1@3606.28,673.05 ; R24.2@3606.28,322.06 3571.72,322.06 cw(c3571.72,335.53) 3558.25,335.53 3558.25,659.94 cw(c3570.25,659.87) 3558.25,660.12 ; 3674.67,952.1 3675.69,951.85 ; 3678.87,951.85 3675.69,951.85 ; 3679.87,951.85 cw(c3679.87,934.03) 3695.35,942.85 ; 3694.21,938.18 ccw(c3674.67,931.42) 3684.29,949.72 3675.69,951.85 ; 3695.35,938.57 3695.35,942.85 ; 3695.35,966.87 cw(c3680.1,967.06) 3695.35,966.81 3695.35,942.85 ; SB512.2@3696.43,1079.48 SB512.2@3696.43,1084.42 ; 3697.68,934.03 ccw(c3679.87,934.03) 3695.35,942.85 ; R22.1@3996.92,987.08 3960.25,987.08 cw(c3960.25,1003.05) 3944.28,1003.05 3944.28,1100.32 ccw(c3923.18,1100.32) 3923.18,1121.42 SB511.2@3890.78,1121.42 3890.78,1162.92 ccw(c3868.65,1162.92) 3868.65,1185.05 3755.84,1185.05 ccw(c3755.84,1085.05) 3685.13,1155.76 3596.74,1067.37 ccw(c3721.17,955.7) 3564.41,1013.84 ccw(c3575.68,1009.72) 3564.01,1012.5 3563.99,1012.44 3560.64,997.98 ccw(c3572.33,995.28) 3560.4,996.6 3558.32,977.52 ccw(c3570.25,976.22) 3558.25,976.22 3558.25,970.09 ; 3558.25,966.85 3558.25,970.09
  Top Layer w20: 3562.5,673 3565.95,673 C29.1@3611.13,673 ; C29.1@3606.28,673.05 C28.1@3660.74,673.04 ; 3629.07,953.25 3647.23,953.25 cw(c3647.23,920.93) 3656.64,951.85 cw(c3647.23,920.93) 3679.54,920.93 U14.4@3679.54,913.6 ; 3658.7,954.29 3666.03,954.29 ccw(c3666.03,986.61) 3698.35,986.61 3698.35,1004.76 ; U14.4@3681.68,904.23 ccw(c3681.68,920.94) 3698.39,920.94 SB512.2@3698.39,1082.51
GND_ELEC6: C33.1 C34.1 R26.1 R28.2 SB611.2 SB612.2 U16.4 | length 2181.1
  Top Layer w12: 1614.69,970.3 ccw(c1634.24,977.06) 1614.77,970.09 ; 1614.77,655.17 cw(c1630.01,654.75) 1622.46,668 ; 1614.77,660.17 ccw(c1626.77,659.87) 1614.77,660.12 ; 1614.77,691.82 ccw(c1630.01,692.25) 1630.01,677 ; 1614.77,938.6 1614.77,966.84 ; 1614.77,950.5 1614.77,660.12 ; 1614.77,966.91 ccw(c1630.01,967.09) 1614.77,966.84 ; 1614.77,976.27 1614.77,966.84 ; 1614.9,936.21 cw(c1634.44,929.45) 1624.82,947.75 ; 1622.46,673 cw(c1630.01,659.75) 1630.01,675 ; 1624.61,958.76 cw(c1634.24,977.06) 1614.77,970.09 ; 1625.82,949.75 1635.44,952.13 1681.73,951.84 1713.15,951.84 1732.2,951.84 ; 1630.01,951.84 cw(c1630.01,967.09) 1614.77,966.84 ; C34.1@1660.85,675 cw(c1660.85,673.05) C34.1@1662.8,673.05 ; R28.2@1662.8,322.06 1628.23,322.06 cw(c1628.23,335.53) 1614.76,335.53 1614.77,659.94 cw(c1626.77,659.87) 1614.77,660.12 ; 1731.19,952.1 1732.2,951.84 ; 1735.39,951.84 1732.2,951.84 ; 1736.39,951.84 cw(c1736.39,934.03) 1751.86,942.85 ; 1750.73,938.18 ccw(c1731.19,931.42) 1740.81,949.72 1732.2,951.84 ; 1751.86,938.57 1751.86,942.85 ; 1751.86,966.87 cw(c1736.62,967.06) 1751.86,966.81 1751.86,942.85 ; SB612.2@1752.94,1079.47 SB612.2@1752.94,1084.42 ; 1754.2,934.03 ccw(c1736.39,934.03) 1751.86,942.85 ; R26.1@2053.44,987.08 2016.77,987.08 cw(c2016.77,1003.05) 2000.8,1003.05 2000.8,1100.32 ccw(c1979.7,1100.32) 1979.7,1121.42 SB611.2@1947.3,1121.42 1947.3,1162.92 ccw(c1925.16,1162.92) 1925.16,1185.05 1812.35,1185.05 ccw(c1812.35,1085.05) 1741.64,1155.76 1653.26,1067.37 ccw(c1777.68,955.7) 1620.93,1013.84 ccw(c1632.2,1009.72) 1620.52,1012.5 1620.51,1012.44 1617.15,997.98 ccw(c1628.84,995.28) 1616.92,996.6 1614.84,977.52 ccw(c1626.77,976.22) 1614.77,976.22 1614.77,970.09 ; 1614.77,966.84 1614.77,970.09
  Top Layer w20: 1619.01,673 1622.46,673 C34.1@1667.65,673 ; C34.1@1662.8,673.05 C33.1@1717.25,673.04 ; 1685.59,953.24 1703.74,953.24 cw(c1703.74,920.93) 1713.15,951.84 cw(c1703.74,920.93) 1736.06,920.93 U16.4@1736.06,913.6 ; 1715.22,954.29 1722.55,954.29 ccw(c1722.55,986.61) 1754.86,986.61 1754.86,1004.76 ; U16.4@1738.2,904.23 ccw(c1738.2,920.94) 1754.91,920.94 SB612.2@1754.91,1082.51
GND_ELEC7: C38.1 C39.1 R30.1 R32.2 SB711.2 SB712.2 U18.4 | length 2181.1
  Top Layer w12: 514.91,970.3 ccw(c534.45,977.06) 514.98,970.09 ; 514.99,655.17 cw(c530.23,654.75) 522.68,668 ; 514.99,660.17 ccw(c526.98,659.87) 514.98,660.12 ; 514.99,691.82 ccw(c530.23,692.25) 530.23,677 ; 514.98,938.6 514.98,966.84 ; 514.98,950.5 514.98,660.12 ; 514.98,966.91 ccw(c530.23,967.09) 514.98,966.84 ; 514.98,976.27 514.98,966.84 ; 515.12,936.21 cw(c534.66,929.45) 525.04,947.75 ; 522.68,673 cw(c530.23,659.75) 530.23,675 ; 524.83,958.76 cw(c534.45,977.06) 514.98,970.09 ; 526.04,949.75 535.66,952.13 581.94,951.85 613.37,951.85 632.42,951.85 ; 530.23,951.85 cw(c530.23,967.09) 514.98,966.84 ; C39.1@561.07,675 cw(c561.07,673.05) C39.1@563.01,673.05 ; R32.2@563.01,322.06 528.45,322.06 cw(c528.45,335.53) 514.98,335.53 514.98,659.94 cw(c526.98,659.87) 514.98,660.12 ; 631.4,952.1 632.42,951.85 ; 635.6,951.85 632.42,951.85 ; 636.6,951.85 cw(c636.6,934.03) 652.08,942.85 ; 650.95,938.18 ccw(c631.4,931.42) 641.02,949.72 632.42,951.85 ; 652.08,938.57 652.08,942.85 ; 652.08,966.87 cw(c636.84,967.06) 652.08,966.81 652.08,942.85 ; SB712.2@653.16,1079.47 SB712.2@653.16,1084.42 ; 654.41,934.03 ccw(c636.6,934.03) 652.08,942.85 ; R30.1@953.65,987.08 916.99,987.08 cw(c916.99,1003.05) 901.01,1003.05 901.01,1100.32 ccw(c879.91,1100.32) 879.91,1121.42 SB711.2@847.51,1121.42 847.51,1162.92 ccw(c825.38,1162.92) 825.38,1185.05 712.57,1185.05 ccw(c712.57,1085.05) 641.86,1155.76 553.47,1067.37 ccw(c677.9,955.7) 521.14,1013.84 ccw(c532.42,1009.72) 520.74,1012.5 520.73,1012.44 517.37,997.98 ccw(c529.06,995.28) 517.13,996.6 515.05,977.52 ccw(c526.98,976.22) 514.98,976.22 514.98,970.09 ; 514.98,966.84 514.98,970.09
  Top Layer w20: 519.23,673 522.68,673 C39.1@567.86,673 ; C39.1@563.01,673.05 C38.1@617.47,673.04 ; 585.8,953.25 603.96,953.25 cw(c603.96,920.93) 613.37,951.85 cw(c603.96,920.93) 636.27,920.93 U18.4@636.27,913.6 ; 615.43,954.29 622.77,954.29 ccw(c622.77,986.61) 655.08,986.61 655.08,1004.76 ; U18.4@638.41,904.23 ccw(c638.41,920.94) 655.12,920.94 SB712.2@655.12,1082.51
GND_ELEC8: C43.1 C44.1 R34.1 R36.2 SB811.2 SB812.2 U20.4 | length 2181.1
  Top Layer w12: -54.07,970.3 ccw(c-34.52,977.06) -53.99,970.09 ; -53.99,655.17 cw(c-38.75,654.75) -46.3,668 ; -53.99,660.17 ccw(c-41.99,659.87) -53.99,660.12 ; -53.99,691.82 ccw(c-38.75,692.25) -38.75,677 ; -53.99,938.6 -53.99,966.84 ; -53.99,950.5 -53.99,660.12 ; -53.99,966.91 ccw(c-38.75,967.09) -53.99,966.84 ; -53.99,976.27 -53.99,966.84 ; -53.86,936.21 cw(c-34.32,929.45) -43.94,947.75 ; -46.3,673 cw(c-38.75,659.75) -38.75,675 ; -44.15,958.76 cw(c-34.52,977.06) -53.99,970.09 ; -42.94,949.75 -33.32,952.13 12.97,951.84 44.39,951.84 63.44,951.84 ; -38.75,951.84 cw(c-38.75,967.09) -53.99,966.84 ; C44.1@-7.91,675 cw(c-7.91,673.05) C44.1@-5.96,673.05 ; R36.2@-5.96,322.06 -40.52,322.06 cw(c-40.52,335.53) -54,335.53 -53.99,659.94 cw(c-41.99,659.87) -53.99,660.12 ; 62.43,952.1 63.44,951.84 ; 66.63,951.84 63.44,951.84 ; 67.63,951.84 cw(c67.63,934.03) 83.1,942.85 ; 81.97,938.18 ccw(c62.43,931.42) 72.05,949.72 63.44,951.84 ; 83.1,938.57 83.1,942.85 ; 83.1,966.87 cw(c67.86,967.06) 83.1,966.81 83.1,942.85 ; SB812.2@84.18,1079.47 SB812.2@84.18,1084.42 ; 85.44,934.03 ccw(c67.63,934.03) 83.1,942.85 ; R34.1@384.68,987.08 348.01,987.08 cw(c348.01,1003.05) 332.04,1003.05 332.04,1100.32 ccw(c310.94,1100.32) 310.94,1121.42 SB811.2@278.54,1121.42 278.54,1162.92 ccw(c256.4,1162.92) 256.4,1185.05 143.59,1185.05 ccw(c143.59,1085.05) 72.88,1155.76 -15.5,1067.37 ccw(c108.92,955.7) -47.83,1013.84 ccw(c-36.56,1009.72) -48.24,1012.5 -48.25,1012.44 -51.61,997.98 ccw(c-39.92,995.28) -51.84,996.6 -53.92,977.52 ccw(c-41.99,976.22) -53.99,976.22 -53.99,970.09 ; -53.99,966.84 -53.99,970.09
  Top Layer w20: -49.75,673 -46.3,673 C44.1@-1.11,673 ; C44.1@-5.96,673.05 C43.1@48.49,673.04 ; 16.83,953.24 34.98,953.24 cw(c34.98,920.93) 44.39,951.84 cw(c34.98,920.93) 67.3,920.93 U20.4@67.3,913.6 ; 46.46,954.29 53.79,954.29 ccw(c53.79,986.61) 86.1,986.61 86.1,1004.76 ; U20.4@69.44,904.23 ccw(c69.44,920.94) 86.15,920.94 SB812.2@86.15,1082.51
Measure1: J1.1 LED1.1 SB1.1 SB16.1 U1.7 | length 8532.1
  Top Layer w12: U1.7@7950.38,259.35 v1(7950.38,365.14) ; J1.1@8177.54,733.06 J1.1@8177.87,733.38 ; LED1.1@8177.54,818.52 LED1.1@8178.19,817.87 ; v1@8177.87,788.06 v1(8178.19,788.39)
  Top Layer w15: SB16.1@4140.38,5351.05 v1(4140.38,5375.05) SB1.1@4140.38,5399.05
  Top Layer w20: J1.1@8177.87,733.38 v1@8177.87,788.06 ; v1(8178.19,788.39) LED1.1@8178.19,817.87
  Bottom Layer w12: v1(4140.38,5375.05) 4140.38,5031.96 ccw(c4179.41,5031.96) 4179.41,4992.94 4825.14,4992.94 cw(c4827.69,1880.38) 7940.25,1882.94 7940.25,1256.92 7940.25,1256.85 cw(c7874.91,1256.85) 7921.1,1210.63 7774.22,1063.75 ccw(c7860.12,977.86) 7751.85,1032.95 ccw(c7860.12,977.86) 7751.51,1032.27 7746.48,1018.41 7741.58,997.3 7739.35,976.87 7739.35,660.12 ; 7743.82,635.65 7761.7,635.65 ; 7918.24,649.24 cw(c7885.38,682.15) 7885.38,635.65 7761.7,635.65 ; 7918.26,649.27 7967.32,698.32 ; v1(7950.38,365.14) 7950.38,394.68 ccw(c7930.3,394.68) 7930.3,414.76 7761.92,414.76 cw(c7761.92,437.33) 7739.35,437.33 7739.35,610.98 ; 7967.35,698.35 cw(c8008.04,657.6) 8008.04,715.19 8033.03,715.19 8076.82,715.19 8076.88,715.19 ccw(c8076.82,783.2) 8124.95,735.14 v1(8178.19,788.39) ; 7739.35,610.98 cw(c7763.92,610.98) 7763.92,635.55 cw(c7763.92,660.12) 7761.7,635.65 ; 7739.35,610.98 7739.35,660.12 ; 7739.35,660.12 ccw(c7763.92,660.12) 7761.7,635.65
Measure2: J5.1 LED2.1 SB2.1 SB17.1 U7.7 | length 8223.9
  Top Layer w12: U7.7@7280.91,259.35 v1(7280.91,365.14) ; J5.1@7508.07,733.06 J5.1@7508.39,733.38 ; LED2.1@7508.07,818.52 LED2.1@7508.72,817.87 ; v1@7508.39,788.06 v1(7508.72,788.39)
  Top Layer w15: SB17.1@4095.77,5351.05 v1(4095.77,5375.05) SB2.1@4095.77,5399.05 ; v1(7244.53,1218.05) v1(7348.18,1218.05)
  Top Layer w20: J5.1@7508.39,733.38 v1@7508.39,788.06 ; v1(7508.72,788.39) LED2.1@7508.72,817.87
  Bottom Layer w12: v1(4095.77,5375.05) 4095.77,5011.08 ccw(c4147.3,5011.08) 4147.3,4959.56 4476.93,4959.56 cw(c4476.93,4919.11) 4517.38,4919.11 4517.38,4790.43 ccw(c4597.87,4790.43) 4597.87,4709.94 4706.14,4709.94 cw(c4708.33,2070.74) 7347.52,2072.94 7348.18,1336.76 v1(7348.18,1218.05) ; 7074.35,635.65 7092.23,635.65 ; 7104.72,1063.73 ccw(c7190.64,977.86) 7082.38,1032.95 ccw(c7190.64,977.86) 7082.04,1032.27 7077.01,1018.41 7072.1,997.3 7069.88,976.87 7069.88,660.12 ; 7104.75,1063.75 7209.05,1168.06 7234.26,1193.27 ; 7234.29,1193.3 ccw(c7209.49,1218.05) v1(7244.53,1218.05) ; 7248.76,649.24 cw(c7215.91,682.15) 7215.91,635.65 7092.23,635.65 ; 7248.79,649.27 7297.84,698.32 cw(c7338.56,657.6) 7338.56,715.19 7363.55,715.19 7407.34,715.19 7407.41,715.19 ccw(c7407.35,783.2) 7455.47,735.15 v1(7508.72,788.39) ; v1(7280.91,365.14) 7280.91,394.68 ccw(c7260.82,394.68) 7260.82,414.77 7092.44,414.77 cw(c7092.44,437.33) 7069.88,437.33 7069.88,610.98 ; 7069.88,610.98 cw(c7094.45,610.98) 7094.45,635.55 cw(c7094.45,660.12) 7092.23,635.65 ; 7069.88,610.98 7069.88,660.12 ; 7069.88,660.12 ccw(c7094.45,660.12) 7092.23,635.65
Measure3: J8.1 LED3.1 SB3.1 SB18.1 U9.7 | length 7438.1
  Top Layer w12: U9.7@6544.16,259.34 v1(6544.16,365.14) ; J8.1@6771.32,733.05 J8.1@6771.64,733.38 ; LED3.1@6771.32,818.52 LED3.1@6771.97,817.86 ; v1@6771.64,788.06 v1(6771.97,788.38)
  Top Layer w15: SB18.1@4051.17,5351.05 v1(4051.17,5375.05) SB3.1@4051.17,5399.05
  Top Layer w20: J8.1@6771.64,733.38 v1@6771.64,788.06 ; v1(6771.97,788.38) LED3.1@6771.97,817.86
  Bottom Layer w12: v1(4051.17,5375.05) 4051.17,4980.46 ccw(c4106.17,4980.46) 4106.17,4925.46 4185.99,4925.46 cw(c4185.99,4896.66) 4214.79,4896.66 4214.79,4665.04 ccw(c4260.27,4665.04) 4260.27,4619.55 4344.27,4619.55 cw(c4344.27,4517.08) 4446.74,4517.08 4446.74,4440.52 ccw(c5703.88,4416.19) 5478.29,3179.22 cw(c5324.41,1979.64) 6533.75,1992.9 6533.75,1355.04 6533.75,1256.19 cw(c6469.31,1256.19) 6514.88,1210.63 6368,1063.75 ; 6337.6,635.64 6355.48,635.64 ; 6367.98,1063.73 ccw(c6453.89,977.85) 6345.63,1032.94 ccw(c6453.89,977.85) 6345.29,1032.27 6340.26,1018.41 6335.35,997.29 6333.13,976.87 6333.13,660.11 ; 6512.01,649.23 cw(c6479.16,682.14) 6479.16,635.64 6355.48,635.64 ; 6512.04,649.26 6561.1,698.32 cw(c6601.82,657.6) 6601.82,715.18 6626.81,715.18 6670.59,715.18 6670.66,715.18 ccw(c6670.6,783.19) 6718.72,735.14 v1(6771.97,788.38) ; v1(6544.16,365.14) 6544.16,394.67 ccw(c6524.07,394.67) 6524.07,414.76 6355.69,414.76 cw(c6355.69,437.32) 6333.13,437.32 6333.13,610.97 ; 6333.13,610.97 cw(c6357.7,610.97) 6357.7,635.54 cw(c6357.7,660.11) 6355.48,635.64 ; 6333.13,610.97 6333.13,660.11 ; 6333.13,660.11 ccw(c6357.7,660.11) 6355.48,635.64
Measure4: J11.1 LED4.1 SB4.1 SB19.1 U11.7 | length 6840.9
  Top Layer w12: U11.7@5731.44,259.35 v1(5731.44,365.14) ; J11.1@5958.6,733.06 J11.1@5958.93,733.38 ; LED4.1@5958.6,818.52 LED4.1@5959.26,817.87 ; v1@5958.93,788.06 v1(5959.26,788.39)
  Top Layer w15: SB19.1@4006.56,5351.05 v1(4006.56,5375.05) SB4.1@4006.56,5399.05
  Top Layer w20: J11.1@5958.93,733.38 v1@5958.93,788.06 ; v1(5959.26,788.39) LED4.1@5959.26,817.87
  Bottom Layer w12: v1(4006.56,5375.05) 4006.56,4927.38 ccw(c4034.99,4927.38) 4034.99,4898.95 4069.25,4898.95 cw(c4069.25,4865.78) 4102.43,4865.78 4102.43,4354.12 ccw(c5365.08,4341.46) 4894.64,3169.65 cw(c4479.71,1999.39) 5721.25,2014.95 5721.25,1256.71 cw(c5656.09,1256.71) 5702.16,1210.63 5555.28,1063.75 ; 5524.89,635.65 5542.77,635.65 ; 5555.26,1063.73 ccw(c5641.18,977.86) 5532.92,1032.95 ccw(c5641.18,977.86) 5532.57,1032.27 5527.55,1018.41 5522.64,997.3 5520.42,976.87 5520.42,660.12 ; 5699.3,649.24 cw(c5666.45,682.15) 5666.45,635.65 5542.77,635.65 ; 5699.33,649.27 5748.38,698.32 cw(c5789.1,657.6) 5789.1,715.19 5814.09,715.19 5857.88,715.19 5857.95,715.19 ccw(c5857.89,783.2) 5906.01,735.14 v1(5959.26,788.39) ; v1(5731.44,365.14) 5731.44,394.68 ccw(c5711.36,394.68) 5711.36,414.77 5542.98,414.77 cw(c5542.98,437.33) 5520.42,437.33 5520.42,610.98 ; 5520.42,610.98 cw(c5544.99,610.98) 5544.99,635.55 cw(c5544.99,660.12) 5542.77,635.65 ; 5520.42,610.98 5520.42,660.12 ; 5520.42,660.12 ccw(c5544.99,660.12) 5542.77,635.65
Measure5: J14.1 LED5.1 SB5.1 SB24.1 U13.7 | length 6255.1
  Top Layer w12: U13.7@3769.28,259.35 v1(3769.28,365.14) ; J14.1@3996.44,733.06 J14.1@3996.77,733.38 ; LED5.1@3996.44,818.52 LED5.1@3997.09,817.87 ; v1@3996.77,788.06 v1(3997.09,788.39)
  Top Layer w15: SB24.1@3961.95,5351.05 v1(3961.95,5375.05) SB5.1@3961.95,5399.05
  Top Layer w20: J14.1@3996.77,733.38 v1@3996.77,788.06 ; v1(3997.09,788.39) LED5.1@3997.09,817.87
  Bottom Layer w12: 3562.72,635.65 3580.6,635.65 ; 3737.14,649.24 cw(c3704.28,682.15) 3704.28,635.65 3580.6,635.65 ; 3737.16,649.27 3786.22,698.32 ; v1(3769.28,365.14) 3769.28,394.68 ccw(c3749.19,394.68) 3749.19,414.77 3580.81,414.77 cw(c3580.81,437.33) 3558.25,437.33 3558.25,610.98 ; 3786.25,698.35 cw(c3826.94,657.6) 3826.94,715.19 3851.93,715.19 3895.71,715.19 3895.78,715.19 ccw(c3895.72,783.2) 3943.85,735.15 v1(3997.09,788.39) ; v1(3961.95,5375.05) 3961.95,5002.56 cw(c3923.27,5002.56) 3923.27,4963.88 3796.72,4963.88 ccw(c3796.72,4925.91) 3758.75,4925.91 3758.75,4561.31 3758.75,1368.44 3758.75,1255.9 cw(c3694.73,1255.9) 3740,1210.63 3593.12,1063.75 ccw(c3679.02,977.86) 3570.75,1032.95 ccw(c3679.02,977.86) 3570.41,1032.27 3565.38,1018.41 3560.48,997.3 3558.25,976.87 3558.25,660.12 ; 3558.25,610.98 cw(c3582.82,610.98) 3582.82,635.55 cw(c3582.82,660.12) 3580.6,635.65 ; 3558.25,610.98 3558.25,660.12 ; 3558.25,660.12 ccw(c3582.82,660.12) 3580.6,635.65